# Altium PCB PCI Express Mini_3000X5095_52PIN_Full-Mini-Type F1.PCBDOC (part 5 of 8)
Units mm, origin at the board's own origin, x right, y up, seen from the top; angles counter-clockwise.
Board outline 70 x 83.2 mm, 6 copper layers (TopLayer, Layer 1, Layer 2, Layer 3, Layer 4, Bottom Layer), stack 0.914 mm thick; 380 components, 252 nets, 1258 pads, 603 vias.
Unrouted connection lines stored in the file: 10.
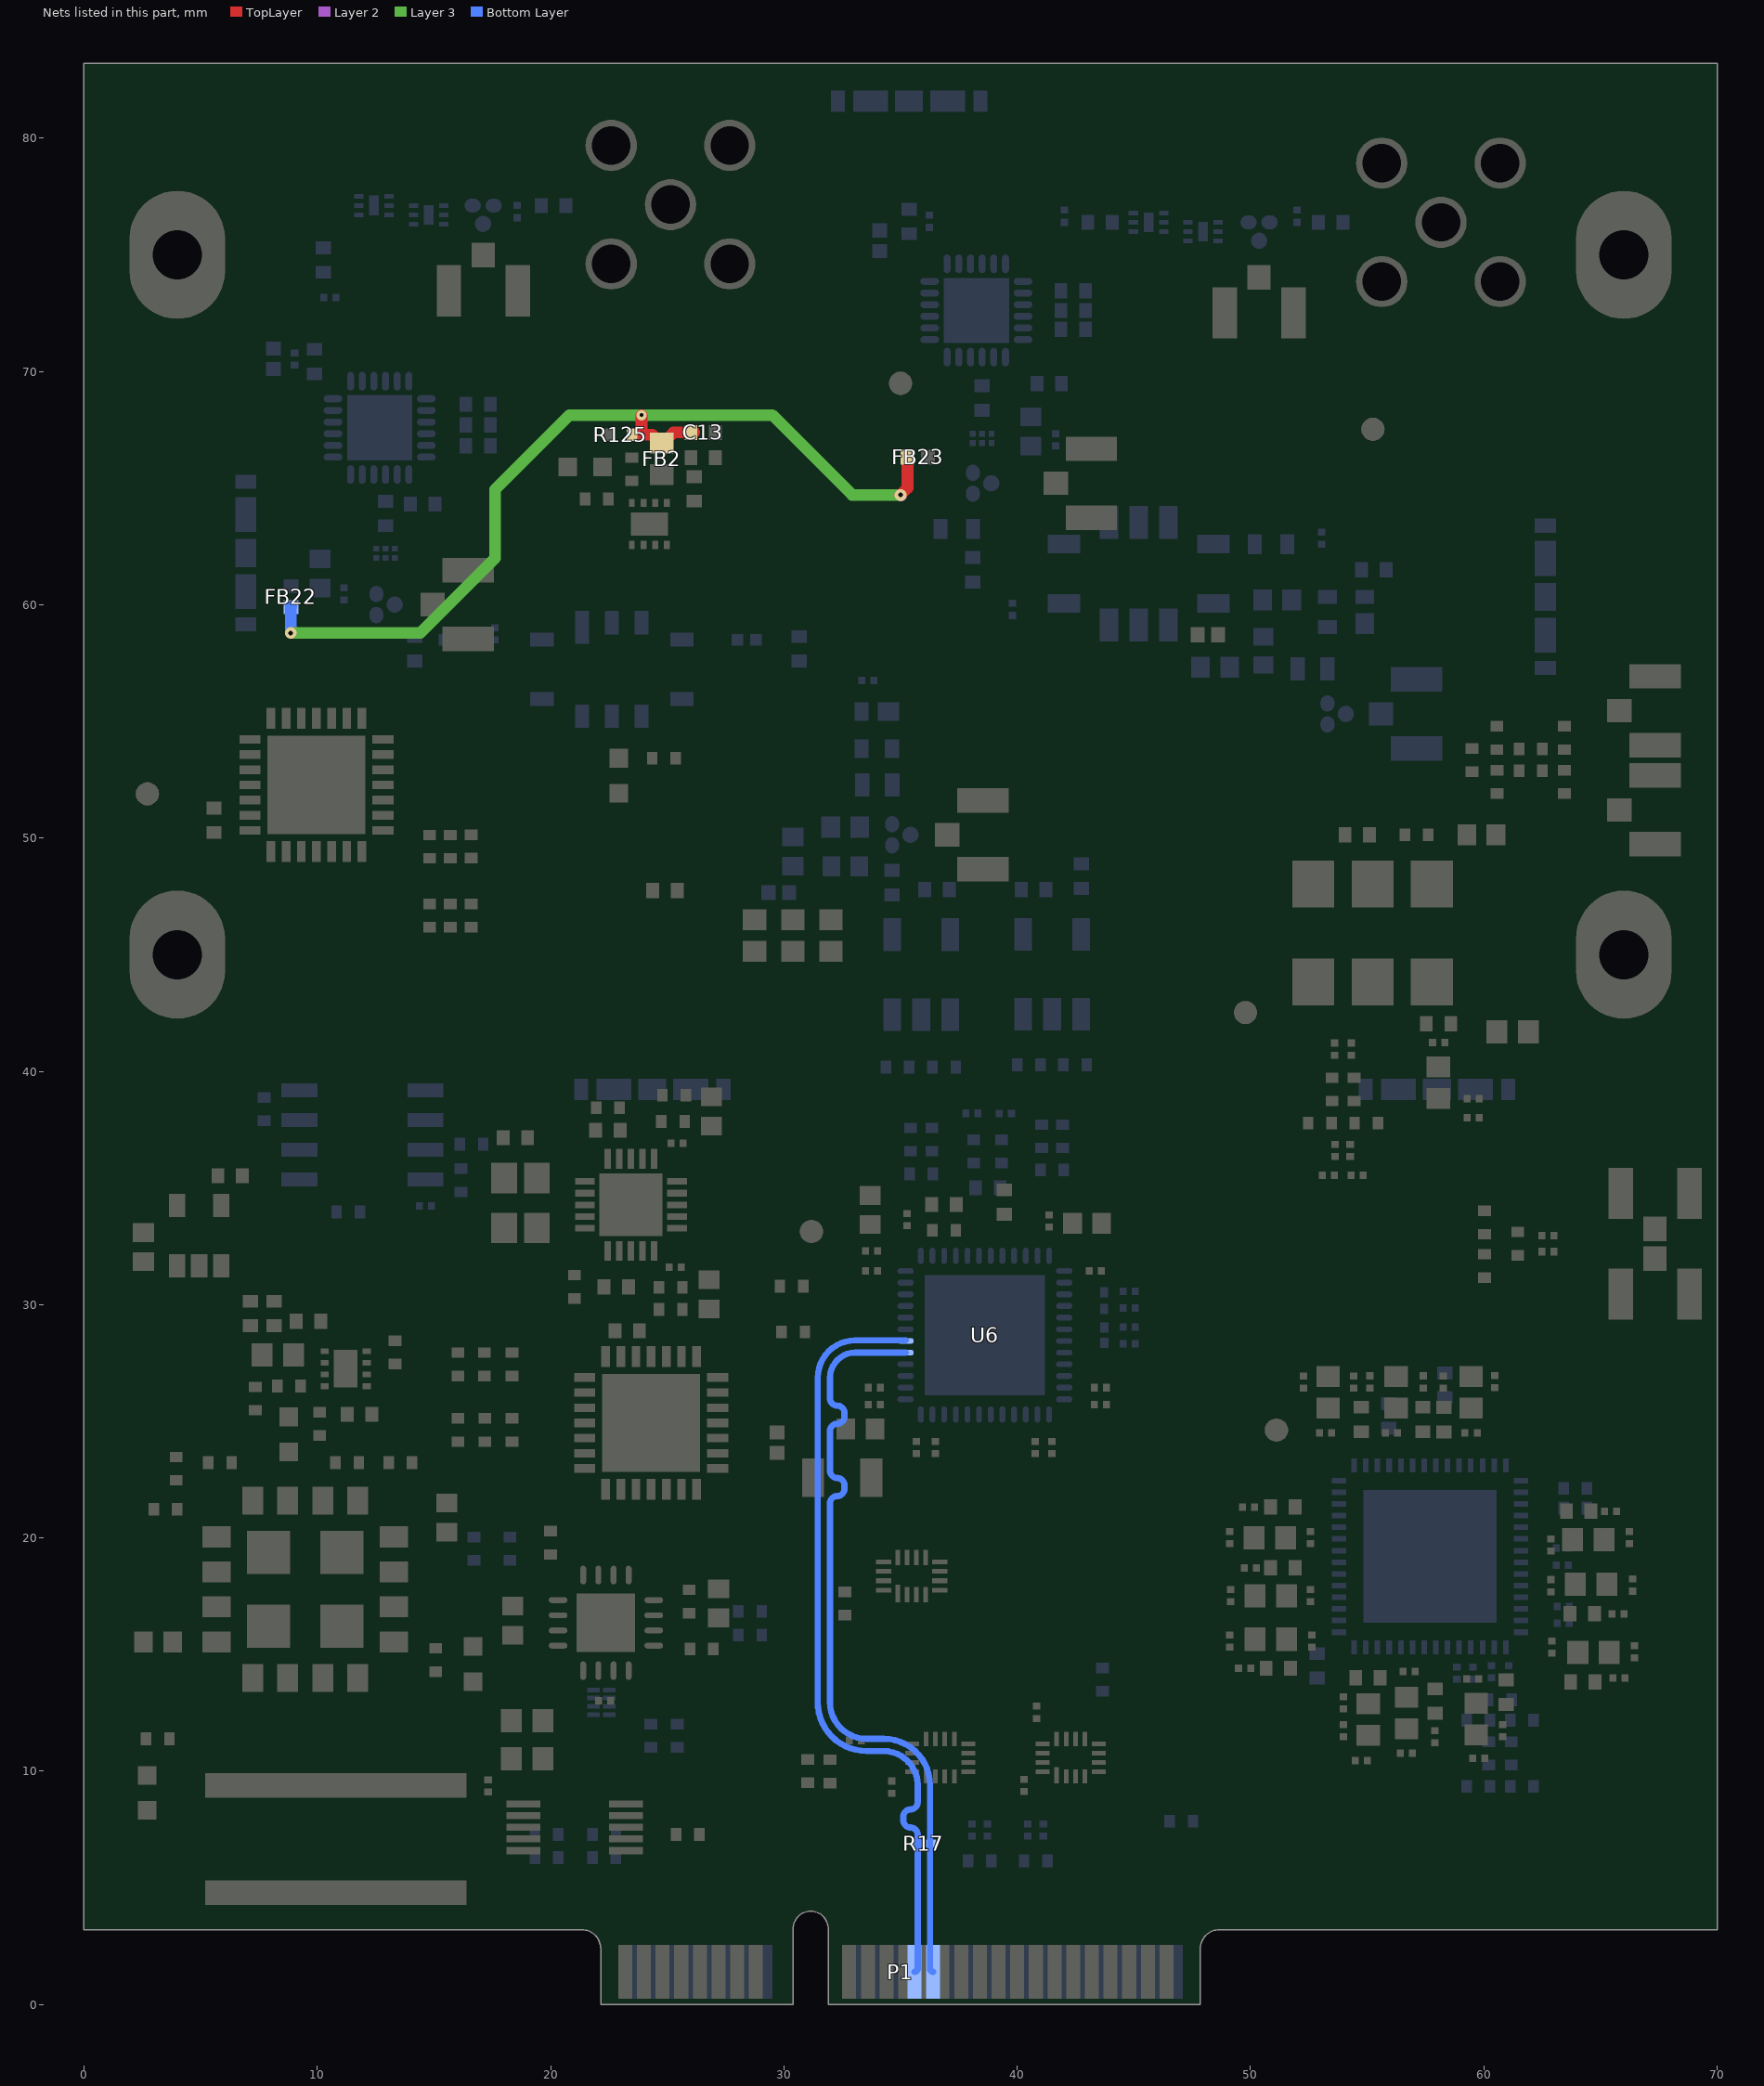
[diagram p6: the nets of this part, all layers, seen from the top]

## Part data (continued)
U17: "1.7-5.5V 1MHZ IND TMP 8-SOIC-N", Manufacturer=Microchip, Supplier Part Number 1=AT24CM02-SSHM-TCT-ND, ComponentLink1Description=http://www.microchip.com/mymicrochip/filehandler.aspx?ddocname=en589710&src-supplier=Digi-Key, ComponentLink1URL=http://www.microchip.com/mymicrochip/filehandler.aspx?ddocname=en589710&src-supplier=Digi-Key, Manufacturer Part Number=AT24CM02-SSHM-T, Pricing 1="1 = 2,51000, 25 = 2,42040, 100 = 2,41540 (USD)", RoHS=No, Stock 1=24235, Supplier 1=Digi-Key
U18 U20: "Silicon Germanium Broadband MMIC Amplifier, DC-6 GHz, 17.5 dB Gain, SOT343, Green", Frequency (f)="DC-6 GHz", Manufacturer=Infineon, Supplier Part Number 1=N/A, ComponentLink1Description="Manufacturer URL", ComponentLink1URL=http://www.infineon.com/, ComponentLink2Description=Datasheet, ComponentLink2URL=http://www.infineon.com/dgdl/BGA616.pdf?folderId=db3a30431441fb5d0114b654e6581730&fileId=db3a304314dca3890115419102bb163b&location=en.Products.RF.RF_MMIC.CATV___Broadband_Amplifier.DATASHEET.BGA616.pdf, ComponentLink3Description="Package Specification", ComponentLink3URL=http://www.infineon.com/dgdl/SOT343-Package_Overview.pdf?folderId=db3a30431936bc4b0119535155343cba&fileId=db3a30431936bc4b0119535a9f393cd3, DatasheetVersion="Rev. 2.1", F (typ)="2.9 dB", Gain (typ)="17.5 dB", Green=yes, Halogen-free=yes, I (typ)="60 mA", Mounting Technology="Surface Mount", P-1dB (in)=+18, PackageDescription="4-Pin Small Outline Transistor Package, 1.25 x 2 mm Body", PackageReference=SOT343, PartNumber=BGA616, Supplier 1=Mouser, Supplier 2=Digi-Key, Supplier Part Number 2=BGA616H6327XTSA1CT-ND
U19 U21: Frequency=70-1000GHz, Supplier Part Number 1=BGA729N6E6327XTSA1CT-ND, Part Number=BGA729N6, Supplier 1=Digi-Key
U22_U_ATT1 U22_U_ATT2: "ANALOG DEVICES   HMC472ALP4E   RF ATTENUATOR, 3.8GHZ, 5.5V, HQFN-24", Attenuation Value=31.5dB, Case/Package=SMD/SMT, Manufacturer="Analog Devices", Max Frequency=3.8GHz, Max Input Voltage=5.5V, Max Operating Temperature=85°C, Max Power Dissipation=560mW, Min Input Voltage=4.5V, Min Operating Temperature=-40°C, Operating Supply Voltage=5V, Package Quantity=50, Supplier Part Number 1=1127-3157-ND, ComponentLink1Description=http://www.mouser.com/ds/2/609/hmc472a-879296.pdf?src-supplier=Mouser, ComponentLink1URL=http://www.mouser.com/ds/2/609/hmc472a-879296.pdf?src-supplier=Mouser, ComponentLink2Description=http://www.analog.com/media/en/technical-documentation/data-sheets/hmc472a.pdf?src-supplier=Avnet+Asia, ComponentLink2URL=http://www.analog.com/media/en/technical-documentation/data-sheets/hmc472a.pdf?src-supplier=Avnet+Asia, ComponentLink3Description=http://www.farnell.com/datasheets/1868224.pdf?src-supplier=Element14, ComponentLink3URL=http://www.farnell.com/datasheets/1868224.pdf?src-supplier=Element14, ComponentLink4Description=https://www.hittite.com/content/documents/data_sheet/hmc472alp4.pdf?src-supplier=Avnet, ComponentLink4URL=https://www.hittite.com/content/documents/data_sheet/hmc472alp4.pdf?src-supplier=Avnet, ComponentLink5Description=https://www.analog.com/media/en/technical-documentation/data-sheets/hmc472a.pdf?src-supplier=Digi-Key, ComponentLink5URL=https://www.analog.com/media/en/technical-documentation/data-sheets/hmc472a.pdf?src-supplier=Digi-Key, Contact Plating=Tin,Matte, Impedance=50R, Insertion Loss=3dB, Lead Free="Contains Lead", Manufacturer Part Number=HMC472ALP4E, Max Supply Voltage=5.5V, Min Supply Voltage=4.5V, Mount="Surface Mount", Number of Bits=6, Number of Channels=1, Number of Pins=24, Packaging="Cut Tape", Pricing 1="1 = 7,47000, 10 = 6,84400, 25 = 6,22160, 100 = 5,59940, 250 = 5,13284, 500 = 4,66620, 1000 = 4,19958 (USD)", REACH SVHC="No SVHC", RoHS=Yes, Stock 1=867, Supplier 1=Digi-Key
U23: "IC TRNSLTR BIDIRECTIONAL 16UQFN", High Level Output Current=-20uA, Low Level Output Current=20uA, Manufacturer 1="Texas Instruments", Max Operating Temperature=85°C, Max Supply Voltage=3.6V, Min Operating Temperature=-40°C, Min Supply Voltage=900mV, Nominal Supply Current=5uA, Package Quantity=1, Quiescent Current=10uA, Supplier Part Number 1=296-29681-1-ND, ComponentLink1Description=https://datasheet.ciiva.com/1900/txb0304-1900817.pdf?src-supplier=Digi-Key, ComponentLink1URL=https://datasheet.ciiva.com/1900/txb0304-1900817.pdf?src-supplier=Digi-Key, ComponentLink2Description=https://datasheet.ciiva.com/15096/getdatasheetpartid-490462-15096317.pdf?src-supplier=Verical, ComponentLink2URL=https://datasheet.ciiva.com/15096/getdatasheetpartid-490462-15096317.pdf?src-supplier=Verical, ComponentLink3Description=https://datasheet.ciiva.com/1900/txb0304-1900818.pdf?src-supplier=Digi-Key, ComponentLink3URL=https://datasheet.ciiva.com/1900/txb0304-1900818.pdf?src-supplier=Digi-Key, ComponentLink4Description=https://datasheet.ciiva.com/1900/txb0304-1900819.pdf?src-supplier=Digi-Key, ComponentLink4URL=https://datasheet.ciiva.com/1900/txb0304-1900819.pdf?src-supplier=Digi-Key, ComponentLink5Description=https://datasheet.ciiva.com/14287/txb0304-14287243.pdf?src-supplier=Avnet, ComponentLink5URL=https://datasheet.ciiva.com/14287/txb0304-14287243.pdf?src-supplier=Avnet, Contact Plating=Gold, Data Rate=140Mbps, Lead Free="Lead Free", Logic Function=Translator, Manufacturer Part Number 1=TXB0304RSVR, Mount="Surface Mount", Number of Bits=4, Number of Channels=4, Number of Inputs=4, Number of Outputs=4, Number of Pins=16, Packaging="Tape and Reel", Pricing 1="1=1.45000, 10=1.29700, 100=1.01160, 500=0.83564, 1000=0.65972 (USD)", Propagation Delay=4.8ns, Radiation Hardening=No, REACH SVHC="No SVHC", RoHS=Yes, Stock 1=1758, Supplier 1=Digi-Key, Turn-On Delay Time=18.9ns
X1: "OSC VCXO 122.88MHZ LVPECL SMD", Case/Package=SMD/SMT, Frequency=122.88MHz, Manufacturer=Epson, Max Operating Temperature=85°C, Max Supply Current=65mA, Min Operating Temperature=-40°C, Supplier Part Number 1=SER3907CT-ND, ComponentLink1Description=https://datasheet.ciiva.com/29626/vg-4513ca-partnumber-29626986.pdf?src-supplier=Digi-Key, ComponentLink1URL=https://datasheet.ciiva.com/29626/vg-4513ca-partnumber-29626986.pdf?src-supplier=Digi-Key, ComponentLink2Description=https://datasheet.ciiva.com/29626/vg-4513ca-partnumber-29626987.pdf?src-supplier=Digi-Key, ComponentLink2URL=https://datasheet.ciiva.com/29626/vg-4513ca-partnumber-29626987.pdf?src-supplier=Digi-Key, ComponentLink3Description=https://datasheet.ciiva.com/29626/076-vg-4513ca-cb-e13ya-29626988.pdf?src-supplier=Digi-Key, ComponentLink3URL=https://datasheet.ciiva.com/29626/076-vg-4513ca-cb-e13ya-29626988.pdf?src-supplier=Digi-Key, Height=0.071inch, Lead Free="Lead Free", Length=0.276inch, Manufacturer Part Number=VG-4513CA122.8800M-GFCT3, Mount="Surface Mount", Packaging="Tape and Reel", Pricing 1="1 = 9,91000, 10 = 9,29000, 50 = 8,97980, 100 = 8,67020 (USD)", RoHS=Yes, Stock 1=438, Supplier 1=Digi-Key, Width=0.197inch

## Free pads (board coordinates)
  oval 4.1x5.5 hole 2.1 slot 4 at 90 deg unplated: ""(4,45) ""(4,75) ""(66,45) ""(66,75)

## Via types
v1: diameter 0.45, hole 0.15, TopLayer to Bottom Layer, tented both sides, 332 vias
v2: diameter 0.5, hole 0.2, TopLayer to Bottom Layer, tented both sides, 214 vias
v3: diameter 0.5, hole 0.2, TopLayer to Bottom Layer, 32 vias
v4: diameter 0.45, hole 0.15, TopLayer to Bottom Layer, 25 vias

## Nets (pads, with @x,y where several pads share a name; then routed paths per layer and width w, separated by ;. In a path a pad name is that pad's centre, name@x,y a point inside that pad or via, vN(x,y) a via of type N, cw(c..) or ccw(c..) an arc to the next point about the centre after c; other vN are vias at no path point)
0F_N: P1.26 R17.1 U6.41 | length 33.6
  Bottom Layer w0.267: U6.41@35.217,27.942 33.053,27.942 ccw(c33.053,26.867) 31.977,26.867 31.977,25.98 ccw(c32.287,25.98) 32.287,25.67 cw(c32.287,25.36) 32.597,25.36 32.597,25.205 cw(c32.287,25.205) 32.287,24.895 ccw(c32.287,24.585) 31.977,24.585 31.977,22.88 ccw(c32.287,22.88) 32.287,22.57 cw(c32.287,22.26) 32.597,22.26 32.597,22.105 cw(c32.287,22.105) 32.287,21.795 ccw(c32.287,21.485) 31.977,21.485 31.977,20.576 31.977,12.956 ccw(c33.542,12.956) 33.542,11.391 34.275,11.391 cw(c34.275,9.403) 36.264,9.403 36.264,6.902 36.264,1.536 ccw(c36.4,1.536) P1.26@36.4,1.4
0F_P: P1.24 R17.2 U6.42 | length 33.7
  Bottom Layer w0.267: U6.42@35.217,28.469 33.053,28.469 ccw(c33.053,26.867) 31.45,26.867 31.45,12.956 ccw(c33.542,12.956) 33.542,10.864 34.275,10.864 cw(c34.275,9.403) 35.737,9.403 35.737,8.672 cw(c35.427,8.672) 35.427,8.362 ccw(c35.426,8.052) 35.116,8.052 35.116,7.897 ccw(c35.426,7.897) 35.426,7.587 cw(c35.427,7.277) 35.737,7.277 35.737,7.143 35.737,1.537 cw(c35.6,1.537) P1.24@35.6,1.4
2V8_RF: C13.2 FB2.2 FB22.1 FB23.1 R125.2 | length 39.6
  TopLayer w0.5: v1(23.9,68.131) v1(23.9,68.131) 23.898,67.291 24.355,67.291 24.715,66.931 FB2.2@24.765,66.931 ; FB2.2@24.838,67.004 FB2.2@24.765,66.931 ; C13.2@26.152,67.381 25.265,67.381 24.815,66.931 FB2.2@24.765,66.931 ; v2(35.001,64.708) 35.301,65.008 FB23.1@35.301,66.331
  Layer 2 w0.5: v2(35.001,64.708) v2@35.027,64.682
  Layer 3 w0.5: v2(8.865,58.79) 14.415,58.79 17.615,61.99 17.615,64.932 20.814,68.131 v1(23.9,68.131) 29.506,68.131 32.929,64.708 v2(35.001,64.708)
  Bottom Layer w0.5: v2(8.865,58.79) 8.865,59.895 FB22.1@8.876,59.906